# Altium PCB feed.PcbDoc
Units mil, origin at the board's own origin, x right, y up, seen from the top; angles counter-clockwise.
Board outline 1181.1 x 1181.1 mil, 2 copper layers (Top Layer, Bottom Layer); 26 components, 19 nets, 79 pads, 15 vias.
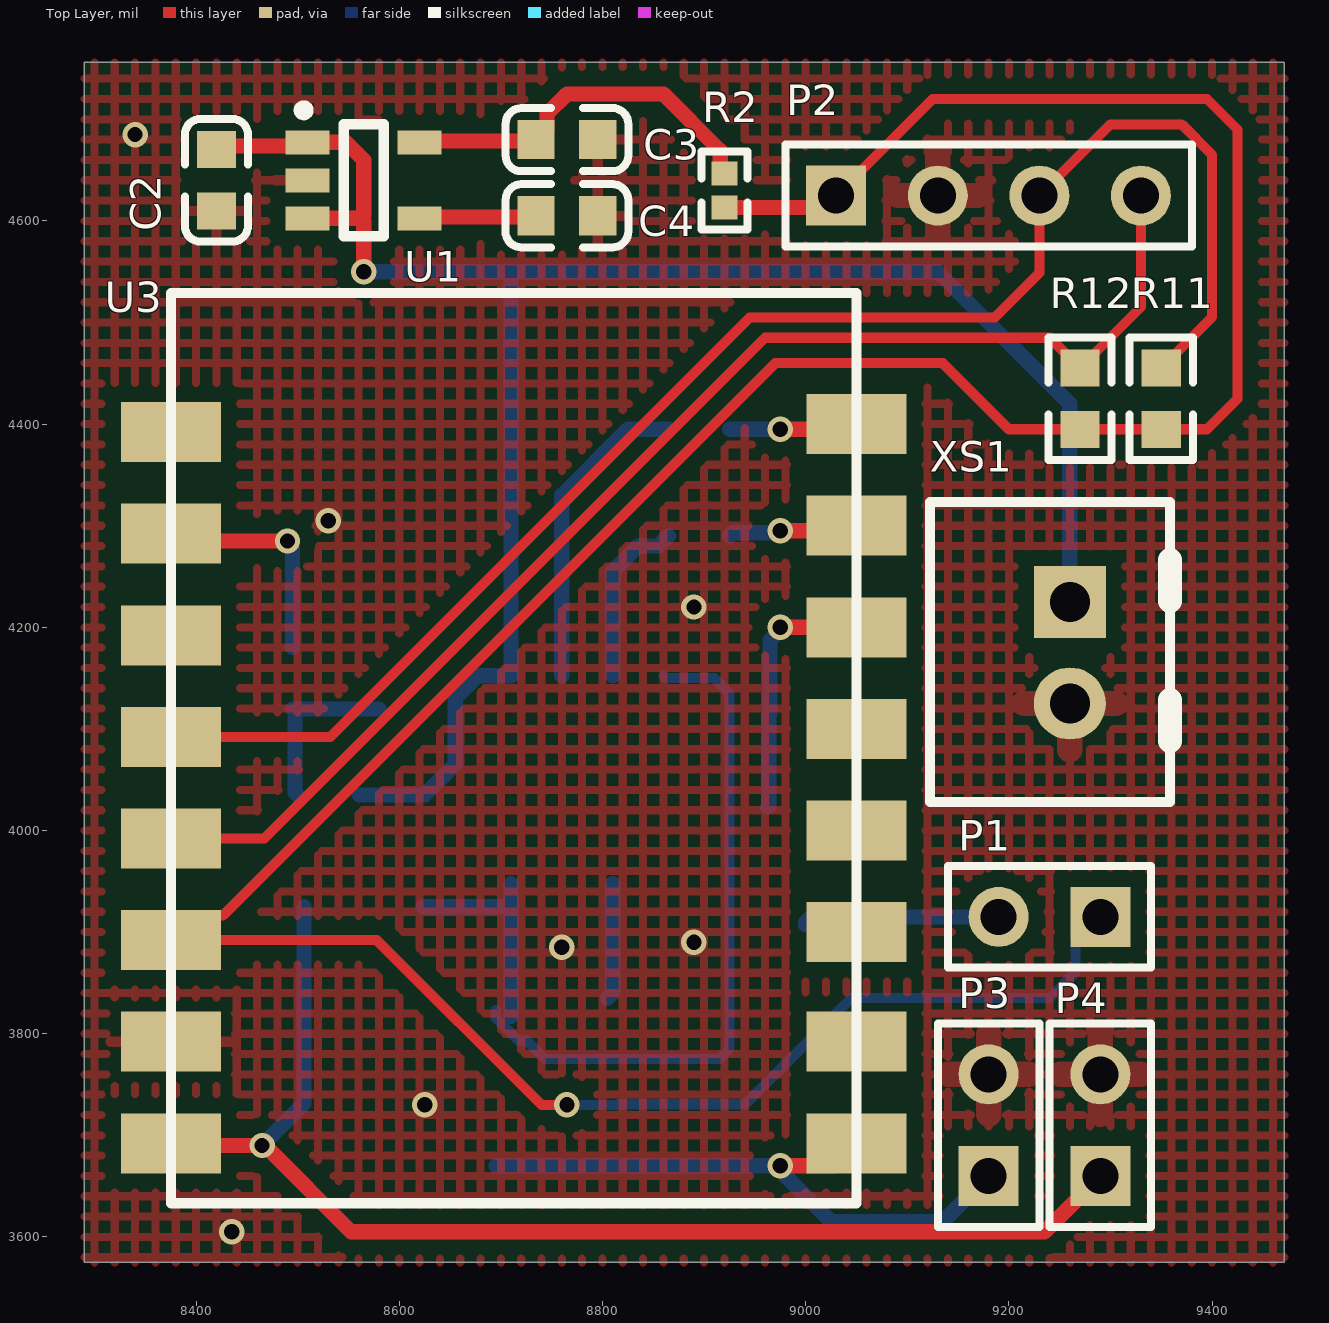
[diagram p0: Top Layer view]
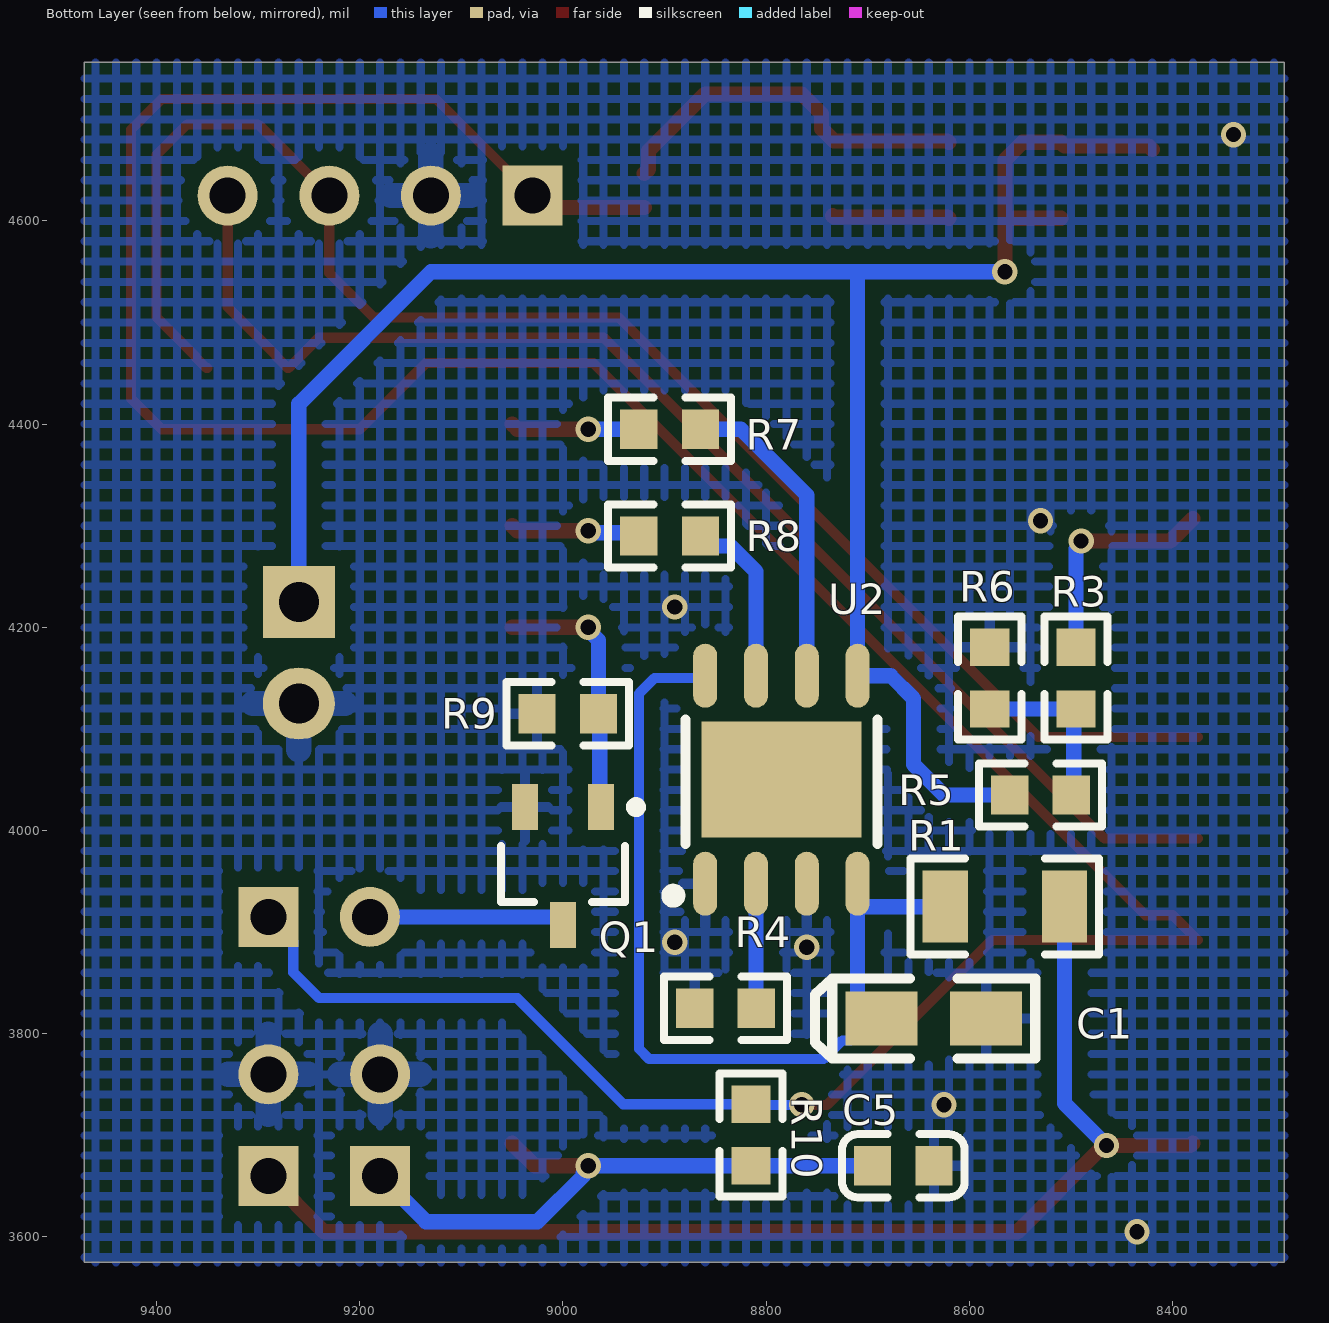
[diagram p1: Bottom Layer view, seen from below]
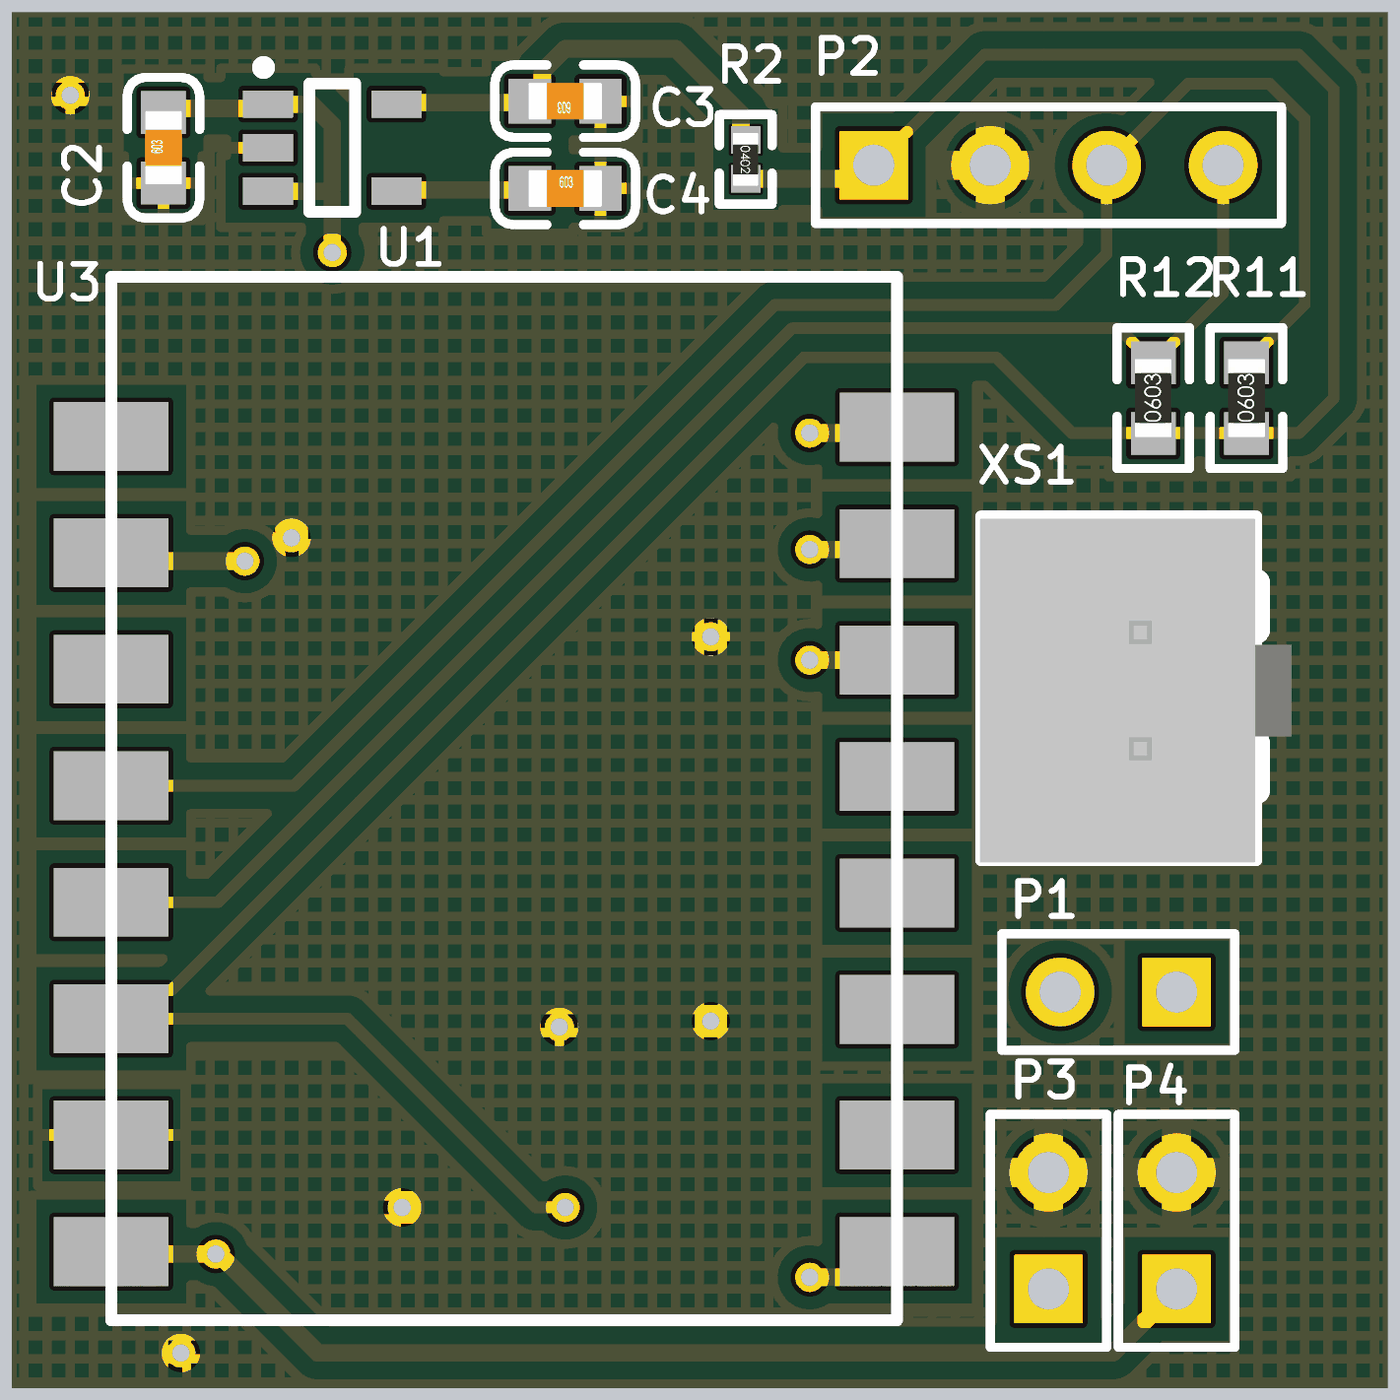
[diagram p2: 3D render of the assembled board from above, using the file's embedded part models]
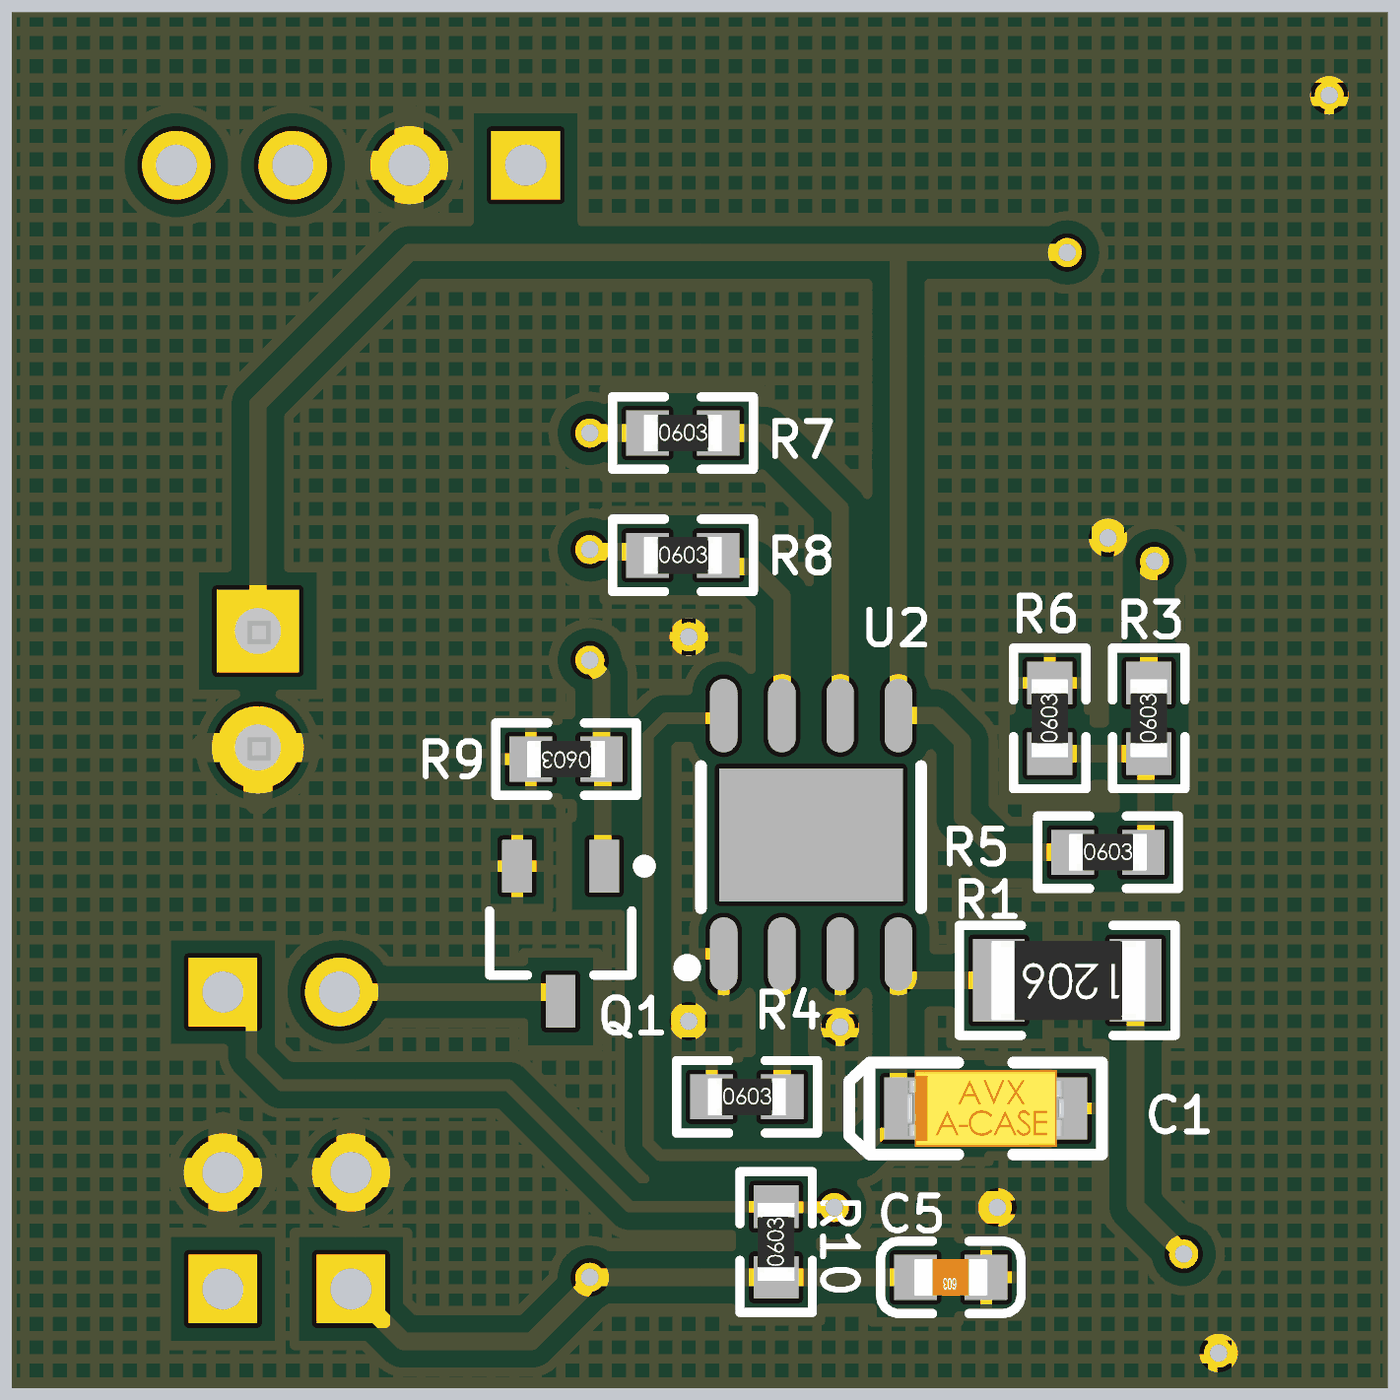
[diagram p3: 3D render of the assembled board from below, using the file's embedded part models]

## Layer stack, top to bottom
Top Solder: solder mask 0.4, Solder Resist, Dk 3.5
Top Layer: signal copper 1.4
Dielectric 1: dielectric 12.6, FR-4, Dk 4.8
Bottom Layer: signal copper 1.4
Bottom Solder: solder mask 0.4, Solder Resist, Dk 3.5

## Board outline
8290,3575 8290,4756.1 9471.1,4756.1 9471.1,3575

## Design rules (kind name [scope] priority, off if disabled: settings)
Clearance Clearance_keep_out [INPOLYGON vs InNet('No Net') And OnLayer('Mechanical 1')] p1 off: gap=15.75 ignorepadtopadclearanceinfootprint=FALSE except(0: Arc-Hole Track-Hole SMDPad-Hole THPad-Hole Via-Hole Fill-Hole Poly-Hole Region-Hole Text-Hole)
Clearance Clearance_Copper [INPOLYGON] p2: gap=15 ignorepadtopadclearanceinfootprint=FALSE except(0: Arc-Hole Track-Hole SMDPad-Hole THPad-Hole Via-Hole Fill-Hole Poly-Hole Region-Hole Text-Hole)
Clearance [All] p3: gap=6 ignorepadtopadclearanceinfootprint=FALSE
ComponentClearance [All] p1: gap=0 collisioncheckmode=3 verticalgap=0 showdistances=FALSE
PlaneConnect [All] p1: planeconnectstyle=Relief reliefexpansion=20 reliefentries=4 reliefconductorwidth=20 reliefairgap=10
PolygonConnect PolygonConnect_power [InNet('GND')] p1 off: thpad.connectstyle=Relief thpad.reliefconductorwidth=30 thpad.reliefentries=4 thpad.polygonreliefangle="90 Angle" thpad.airgapwidth=10 smdpad.connectstyle=Relief smdpad.reliefconductorwidth=10 smdpad.reliefentries=4 smdpad.polygonreliefangle="90 Angle" smdpad.airgapwidth=10 via.connectstyle=Relief via.reliefconductorwidth=10 via.reliefentries=4 via.polygonreliefangle="90 Angle" via.airgapwidth=10
PolygonConnect [All] p2: thpad.connectstyle=Relief thpad.reliefconductorwidth=25 thpad.reliefentries=4 thpad.polygonreliefangle="90 Angle" thpad.airgapwidth=10 smdpad.connectstyle=Relief smdpad.reliefconductorwidth=10 smdpad.reliefentries=4 smdpad.polygonreliefangle="90 Angle" smdpad.airgapwidth=10 via.connectstyle=Direct via.reliefconductorwidth=10 via.reliefentries=4 via.polygonreliefangle="90 Angle" via.airgapwidth=10
PolygonConnect PolygonConnect_via [isvia] p3: connectstyle=Direct reliefconductorwidth=10 reliefentries=4 polygonreliefangle="90 Angle" airgapwidth=10
RoutingVias [All] p1: holewidth=10 width=20 viastyle="Through Hole" minholewidth=8 minwidth=15 maxholewidth=48 maxwidth=60
SolderMaskExpansion [All] p1: expansion=4 istentingtop=FALSE
Width [All] p1: maxlimit=80 minlimit=5 preferedwidth=10
28 further rules are at their usual default settings.

## Components (designator, comment, footprint, x,y, rotation, side; value= is the part's Value field where it differs from the comment)
C1 "10uF (106) ±10% 16V" CASE-A_3216 8635,3815 r0 bottom
C2 "100nF (104) 10% 50V" 0603_C 8420,4640 r90 top
C3 "10uF (106) 10% 10V" 0603_C 8765,4680 r180 top
C4 "22nF (223) 10% 50V" 0603_C 8765,4605 r0 top
C5 "100nF (104) 10% 50V" 0603_C 8665,3670 r0 bottom
P1 "Header 2" HDR1X2 9290,3915 r180 top
P2 "Header 4" HDR1X4 9030,4625 r0 top
P3 "Header 2" HDR1X2 9180,3660 r90 top
P4 "Header 2" HDR1X2 9290,3660 r90 top
Q1 "AO3400A N道沟 X0YV1T SOT-23" SOT-23-3L 9000,3965 r90 bottom
R1 "0.1Ω (R100) ±1%" 1206_R 8565,3925 r0 bottom
R2 "0Ω (0R0) ±1%" 0402_R 8920,4630 r270 top
R3 "1KΩ (1001) ±1%" 0603_R 8495,4150 r90 bottom
R4 "1.2KΩ (1201) ±1%" 0603_R 8840,3825 r180 bottom
R5 "100KΩ (1003) ±1%" 0603_R 8530,4035 r180 bottom
R6 "100KΩ (1003) ±1%" 0603_R 8580,4150 r90 bottom
R7 "510Ω (5100) ±1%" 0603_R 8895,4395 r180 bottom
R8 "510Ω (5100) ±1%" 0603_R 8895,4290 r180 bottom
R9 "10KΩ (1002) ±1%" 0603_R 8995.31,4115 r0 bottom
R10 "10KΩ (1002) ±1%" 0603_R 8815,3700.31 r90 bottom
R11 "1KΩ (1001) ±1%" 0603_R 9350,4425 r90 top
R12 "1KΩ (1001) ±1%" 0603_R 9270,4425 r90 top
U1 "RT9193-33" SOT-23-5 8565,4640 r180 top
U2 "TP4056" SOP-8_EP_150mil 8785,4050 r180 bottom
U3 "ESP32C3-FH4" ESP32C3-FH4 8375.2,4529.13 r0 top locked
XS1 "HA-2A" HA-2A 9260,4175 r270 top

## Footprints (in the part's own frame and the unit in brackets; to place one, negate y for a bottom-side part, rotate by r counter-clockwise, add the part's x,y. Pads: shape width x height; smd on the part's side, far side on the other; paste and mask are expansions set on the pad)
0402_R [mm]
  rect 0.6x0.65 smd mask+0.051: 1(-0.425,0) 2(0.425,0)
  silkscreen extent -0.97,-0.58 0.97,0.58, body extent -0.57,-0.27 0.58,0.28, height 0.41
0603_C [mm]
  rect 0.93x0.98 smd: 1(-0.77,0) 2(0.77,0)
  silkscreen extent -1.53,-0.79 1.54,0.79, body extent -0.8,-0.4 0.8,0.4, height 0.3
0603_R [mm]
  rect 0.93x0.98 smd: 1(-0.77,0) 2(0.77,0)
  silkscreen extent -1.53,-0.79 1.54,0.79, body extent -0.85,-0.4 0.85,0.4, height 0.56
1206_R [mm]
  rect 1.13x1.8 smd: 1(-1.49,0) 2(1.49,0)
  silkscreen extent -2.36,-1.2 2.35,1.2, body extent -1.7,-0.86 1.65,0.87, height 0.85
CASE-A_3216 [mm]
  rect 1.8x1.35 smd: 1(1.31,0) 2(-1.31,0)
  silkscreen extent -2.54,-1 2.97,1, body extent -1.7,-0.84 1.7,0.84, height 1.71
ESP32C3-FH4 [mm] "supermini 核心板"
  rect 2.5x1.5 smd: 1(0,-3.48) 2(0,-6.02) 3(0,-8.56) 4(0,-11.1) 5(0,-13.64) 6(0,-16.18) 7(0,-18.72) 8(0,-21.26) 9(17.14,-21.26) 10(17.14,-18.72) 11(17.14,-15.98) 12(17.14,-13.44) 13(17.14,-10.9) 14(17.14,-8.36) 15(17.14,-5.82) 16(17.14,-3.28)
  silkscreen extent 0,-22.76 17.14,0
HA-2A [mm]
  rect 1.8x1.8 hole 1: 1(-1.27,0)
  round 1.8 hole 1: 2(1.27,0)
  silkscreen extent -3.77,-3.5 3.73,2.5, body extent -3.72,-3.53 3.78,3.27, height 7.5
HDR1X2 [mm] "Connector; Header; 2 Position"
  rect 1.5x1.5 hole 0.9: 1(0,0)
  round 1.5 hole 0.9: 2(2.54,0)
  silkscreen extent -1.27,-1.27 3.81,1.27
HDR1X4 [mm] "Connector; Header; 4 Position"
  rect 1.5x1.5 hole 0.9: 1(0,0)
  round 1.5 hole 0.9: 2(2.54,0) 3(5.08,0) 4(7.62,0)
  silkscreen extent -1.27,-1.27 8.89,1.27
SOP-8_EP_150mil [mm]
  rect 4x2.9 smd: 0(0,0)
  oval 0.6x1.6 smd: 1(-1.905,-2.6) 2(-0.635,-2.6) 3(0.635,-2.6) 4(1.905,-2.6) 5(1.905,2.6) 6(0.635,2.6) 7(-0.635,2.6) 8(-1.905,2.6)
  silkscreen extent -2.85,-3.05 2.4,1.5
SOT-23-3L [mm] "http://www.aosmd.com/res/packaging_information/SOT-23-3L.pdf"
  rect 1.15x0.65 smd: 1(1.475,-0.95) 2(1.475,0.95) 3(-1.475,0)
  silkscreen extent -0.9,-1.95 1.6,1.55, body extent -0.9,-1.55 0.9,1.55, height 1.25
SOT-23-5 [mm]
  rect 1.1x0.6 smd: 1(1.4,-0.95) 2(1.4,0) 3(1.4,0.95) 4(-1.4,0.95) 5(-1.4,-0.95)
  silkscreen extent -0.5,-1.87 1.62,1.4

## Part data
C1: library part "3216 10uF (106) 10% 16V", "钽电容", Package=3216, SuppliersPartNumber=C7171, ComponentLink1Description=供应商链接, ComponentLink1URL=http://www.szlcsc.com/product/details_7643.html, Supplier=LC
C2 C5: library part "0603 100nF (104) 10% 50V", "贴片电容", Package=0603, SuppliersPartNumber=C14663, ComponentLink1Description=供应商链接, ComponentLink1URL=http://www.szlcsc.com/product/details_15331.html, Supplier=LC
C3: library part "0603 10uF (106) 10% 10V", "贴片电容", Package=0603, SuppliersPartNumber=C19702, ComponentLink1Description=供应商链接, ComponentLink1URL=http://www.szlcsc.com/product/details_20411.html, Supplier=LC
C4: library part "0603 22nF (223) 10% 50V", "贴片电容", Package=0603, SuppliersPartNumber=C21122, ComponentLink1Description=供应商链接, ComponentLink1URL=http://www.szlcsc.com/product/details_21834.html, Supplier=LC
P1 P3 P4: "Header, 2-Pin", LatestRevisionDate=17-Jul-2002, LatestRevisionNote="Re-released for DXP Platform.", Publisher="Altium Limited"
P2: "Header, 4-Pin", LatestRevisionDate=17-Jul-2002, LatestRevisionNote="Re-released for DXP Platform.", Publisher="Altium Limited"
Q1: "MOS(场效应管)", Package=SOT-23, SuppliersPartNumber=C20917, ComponentLink1Description=供应商链接, ComponentLink1URL=http://www.szlcsc.com/product/details_21629.html, Supplier=LC
R1: library part "1206 0.1Ω (R100) 1%", "贴片电阻", Package=1206, SuppliersPartNumber=C25334, ComponentLink1Description=供应商链接, ComponentLink1URL=http://www.szlcsc.com/product/details_26077.html, Supplier=LC
R2: library part "0402 0Ω (0R0) 1%", "贴片电阻", Package=0402, SuppliersPartNumber=C17168, ComponentLink1Description=供应商链接, ComponentLink1URL=http://www.szlcsc.com/product/details_17853.html, Supplier=LC
R3 R11 R12: library part "0603 1KΩ (1001) 1%", "贴片电阻", Package=0603, SuppliersPartNumber=C21190, ComponentLink1Description=供应商链接, ComponentLink1URL=http://www.szlcsc.com/product/details_21904.html, Supplier=LC
R4: library part "0603 1.2KΩ (1201) 1%", "贴片电阻", Package=0603, SuppliersPartNumber=C22765, ComponentLink1Description=供应商链接, ComponentLink1URL=http://www.szlcsc.com/product/details_23492.html, Supplier=LC
R5 R6: library part "0603 100KΩ (1003) 1%", "贴片电阻", Package=0603, SuppliersPartNumber=C25803, ComponentLink1Description=供应商链接, ComponentLink1URL=http://www.szlcsc.com/product/details_26546.html, Supplier=LC
R7 R8: library part "0603 510Ω (5100) 1%", "贴片电阻", Package=0603, SuppliersPartNumber=C23193, ComponentLink1Description=供应商链接, ComponentLink1URL=http://www.szlcsc.com/product/details_23920.html, Supplier=LC
R9 R10: library part "0603 10KΩ (1002) 1%", "贴片电阻", Package=0603, SuppliersPartNumber=C25804, ComponentLink1Description=供应商链接, ComponentLink1URL=http://www.szlcsc.com/product/details_26547.html, Supplier=LC
U1: "3.3V超低压差LDO"
U2: library part TP4056_[C16581], "电池电源管理", Package=SOP-8_EP_150mil, SuppliersPartNumber=C16581, ComponentLink1Description=供应商链接, ComponentLink1URL=http://www.szlcsc.com/product/details_17264.html, Supplier=LC
U3: "ESP32C3-FH4 内置4Mflash supermini核心板"
XS1: "HA-2A 白色"

## Via types
v1: diameter 25, hole 15, Top Layer to Bottom Layer, 15 vias

## Nets (pads, with @x,y where several pads share a name; then routed paths per layer and width w, separated by ;. In a path a pad name is that pad's centre, name@x,y a point inside that pad or via, vN(x,y) a via of type N, cw(c..) or ccw(c..) an arc to the next point about the centre after c; other vN are vias at no path point)
3.3V: P1.1 P2.1 R2.2 R10.2 R11.1 R12.1 U3.6 | length 3227.2
  Top Layer w10: v1(8765,3730) 8740,3730 8577.87,3892.13 U3.6 8399.72,3916.65 8426.65,3916.65 8970,4460 9135,4460 9200,4395 9395,4395 9425,4425 9425,4690 9395,4720 9125,4720 P2.1
  Top Layer w15: R2.2 9018.27,4613.27 P2.1
  Bottom Layer w10: v1(8765,3730) 8814.37,3730 R10.2 8940.63,3730.63 9045,3835 9240,3835 9265.47,3860.47 9265.47,3890.47 P1.1
3.3VB: C3.2 R2.1 U1.5 | length 371.3
  Top Layer w15: U1.5 8621.42,4678.7 8733.39,4678.7 8745.49,4690.81 8745.49,4705.49 8765,4725 8860,4725 8915.92,4669.08 8915.92,4650.81 R2.1
+5: P4.1 R1.1 U3.8 | length 1220.8
  Top Layer w15: U3.8@8380.2,3692.13 8382.32,3690 8467.71,3690 8552.71,3605 9235,3605 P4.1
  Bottom Layer w15: v1(8465,3690) 8506.34,3731.34 R1.1
ADC: R3.2 U3.2 | length 225.9
  Top Layer w15: U3.2@8380.01,4307 8402.01,4285 v1(8490,4285)
  Bottom Layer w15: v1(8490,4285) 8490,4282.29 8495,4277.29 R3.2
Battey: C2.2 R5.1 U1.1 U1.3 U2.5 XS1.1 | length 1896.5
  Top Layer w15: C2.2 8423.54,4673.86 8506.34,4673.86 U1.1 8547.6,4677.4 8565,4660 8565,4605 8562.6,4602.6 ; U1.3 8562.6,4602.6 ; v1(8565,4550) 8565,4600.2 8562.6,4602.6
  Bottom Layer w15: R5.1 8625,4035 8655,4065 8655,4130 8677.36,4152.36 U2.5 8710,4548.79 ; v1(8565,4550) 8710,4550 9130,4550 9260,4420 XS1.1
CHRG: R8.2 U2.7 | length 171.8
  Bottom Layer w15: U2.7 8810,4255 8835.13,4280.13 8854.82,4280.13 R8.2
GND: C1.2 C2.1 C3.1 C4.2 C5.1 P2.2 P3.2 P4.2 Q1.2 R4.1 R6.2 R9.2 U1.2 U2.1 U2.3 U3.7 XS1.2 | length 12.2
  Bottom Layer w15: R9.2 R9.2@9034.24,4106.39
  other v1: 8435,3605 8625,3730 8760,3885 8890,3890 8890,4220 8530,4305 8340,4685
NetC1_1: C1.1 R1.2 U2.4 U2.8 | length 900.4
  Bottom Layer w10: C1.1@8695,3823.43 8695,3815.43 8717.01,3793.43 8725,3793.43 8743.43,3775 8915,3775 8925,3785 8925,4135 8910,4150 8862.36,4150 U2.8
  Bottom Layer w15: R1.2 8704.71,3925 U2.4@8710,3930.29 ; C1.1@8710,3816.85 U2.4@8710,3930.29 ; U2.4 U2.4@8710,3930.29
NetC4_1: C4.1 U1.4 | length 115.6
  Top Layer w15: U1.4 8621.32,4603.8 8733.48,4603.8 C4.1
NetC5_2: C5.2 P3.1 R10.1 U3.9 | length 611.2
  Top Layer w15: v1(8975,3670) 8975.1,3670.1 9027.97,3670.1 U3.9
  Bottom Layer w15: C5.2 R10.1 v1@8970,3670 ; v1@8970.38,3670 8972.29,3670 8980,3662.29 8980,3660 9025,3615 9135,3615 P3.1
NetP1_2: P1.2 Q1.3 | length 206.9
  Top Layer w15: P1.2@9178.08,3915 P1.2
  Bottom Layer w15: Q1.3 9000,3909.7 9005.3,3915 P1.2
NetQ1_1: Q1.1 R9.1 U3.14 | length 257.1
  Top Layer w15: v1(8975,4200) U3.14
  Bottom Layer w15: Q1.1 8963.8,4024.27 8963.8,4113.8 R9.1 8965,4187.29 8975,4197.29 v1(8975,4200)
NetR3_1: R3.1 R5.2 R6.1 | length 171.6
  Bottom Layer w15: R5.2 8497.34,4037.34 8497.34,4117.34 R3.1 R6.1
NetR4_2: R4.2 U2.2 | length 114.7
  Bottom Layer w15: R4.2@8805,3835 8810,3840 U2.2
NetR7_1: R7.1 U3.16 | length 126.8
  Top Layer w15: v1(8975,4395) 9045,4395 U3.16
  Bottom Layer w15: R7.1 v1(8975,4395)
NetR8_1: R8.1 U3.15 | length 128.8
  Top Layer w15: v1(8975,4295) 9045,4295 U3.15
  Bottom Layer w15: R8.1 8928.4,4293.09 8973.09,4293.09 v1(8975,4295)
SCL: P2.3 R11.2 U3.4 | length 1562.6
  Top Layer w10: U3.4 8532.13,4092.13 8945,4505 9186.21,4505 9230,4548.79 P2.3 9300,4695 9370,4695 9400,4665 9400,4505.32 9361.79,4467.11 9361.79,4466.12 9350.98,4455.32 R11.2
SDA: P2.4 R12.2 U3.5 | length 1306.4
  Top Layer w10: U3.5 8467.13,3992.13 8960,4485 9240.32,4485 R12.2 9270.98,4455.32 9281.79,4466.12 9281.79,4467.11 9330,4515.32 P2.4
STDBY: R7.2 U2.6 | length 309.2
  Bottom Layer w15: U2.6 8760,4330 8825,4395 R7.2
pads on no net: U2.0 U3.1 U3.3 U3.10 U3.11 U3.12 U3.13

## Polygon pours and split planes (outlines as drawn)
GND on Top Layer "GND_L01_P000" (hatched 90Degree grid 20 track 8, remove dead copper, pour order 0): 8290,3575 9471.1,3575 9471.1,4756.1 8290,4756.1
GND on Bottom Layer "GND_L02_P001" (hatched 90Degree grid 20 track 8, remove dead copper, pour order 1): 8290,3575 9471.1,3575 9471.1,4756.1 8290,4756.1

## Silkscreen, mask and mechanical layers (free items; w line width, h text height)
Mechanical 1:
  the board outline again, w10